# Altium PCB PCB_14layers_1mm73.PcbDoc (part 1 of 4)
Units mm, origin at the board's own origin, x right, y up, seen from the top; angles counter-clockwise.
Board outline 66 x 50 mm, 14 copper layers (Top Layer, Int1 (GND), Int2 (PWR), Int3 (Sign), GND, Int4 (Sign), Int5 (GND), Int6 (PWR), Int7 (Sign), GND2, Int8 (Sign), Int9 (PWR), Int10 (GND), Bottom Layer), stack 1.644 mm thick; 436 components, 541 nets, 2990 pads, 78 vias.
Unrouted connection lines stored in the file: 1647.
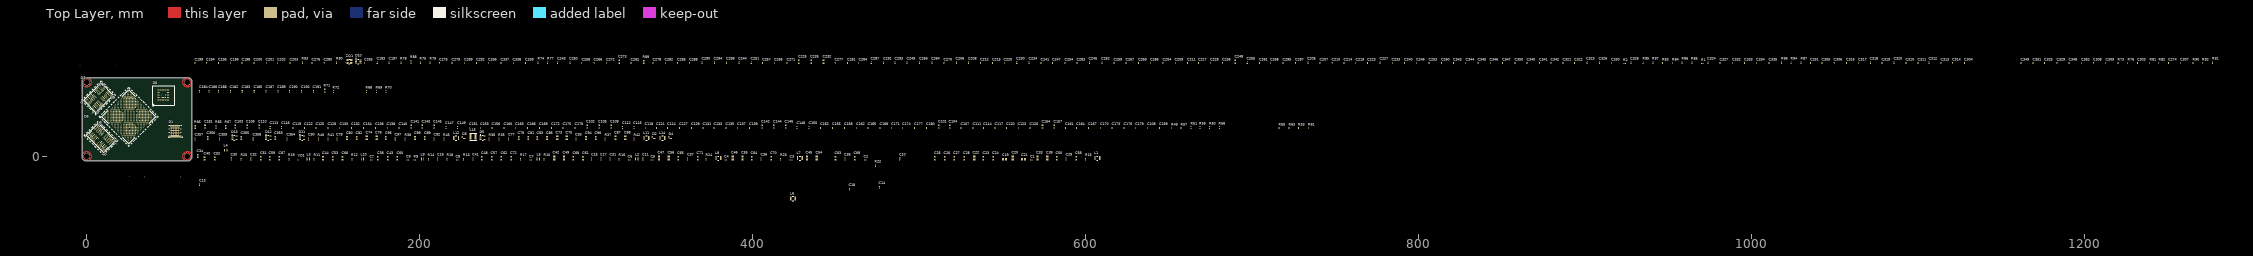
[diagram p0: Top Layer view]
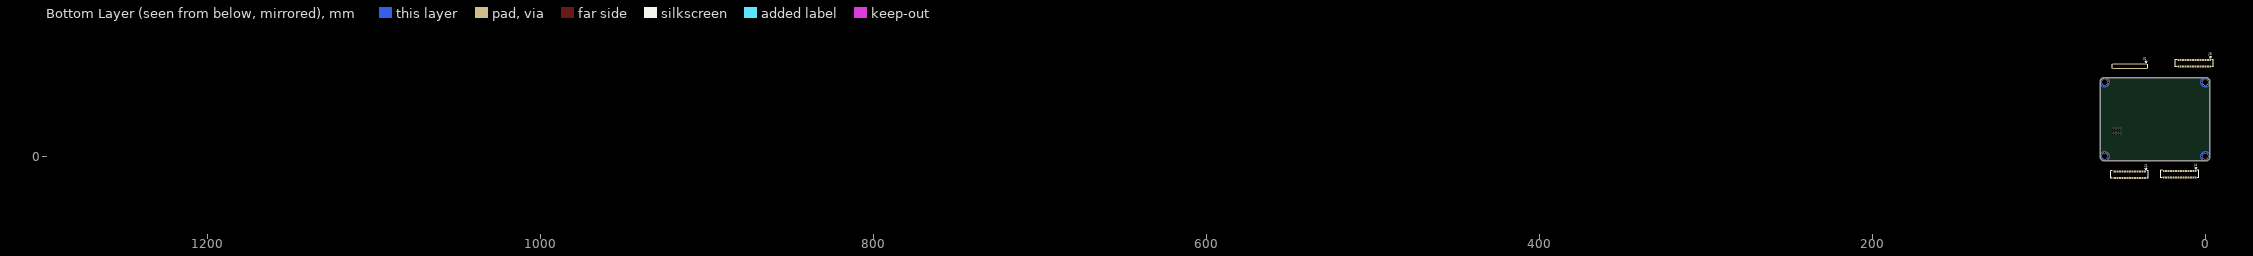
[diagram p1: Bottom Layer view, seen from below]
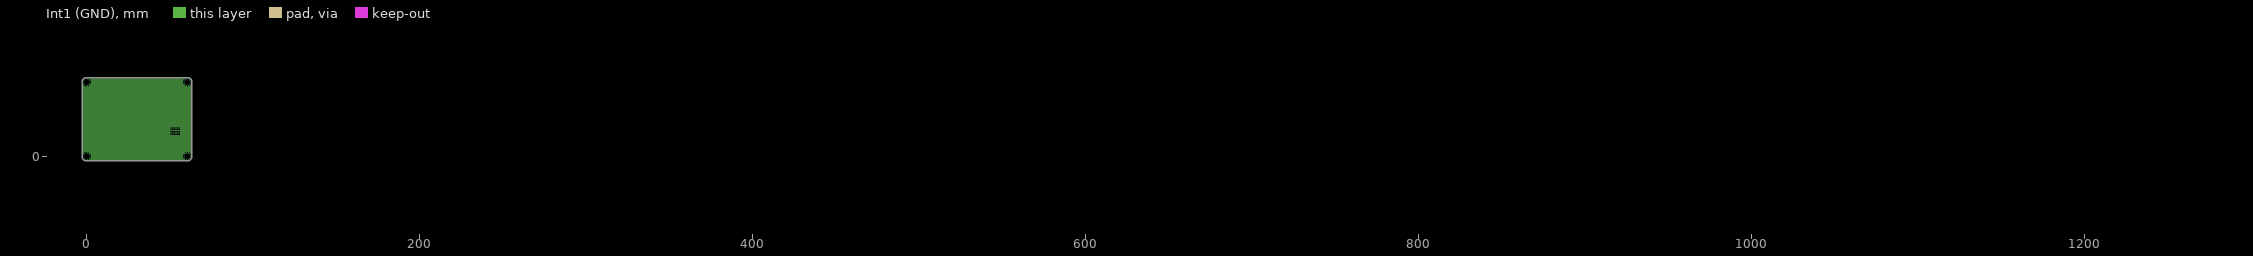
[diagram p2: Int1 (GND), clearances drawn from the general rule]
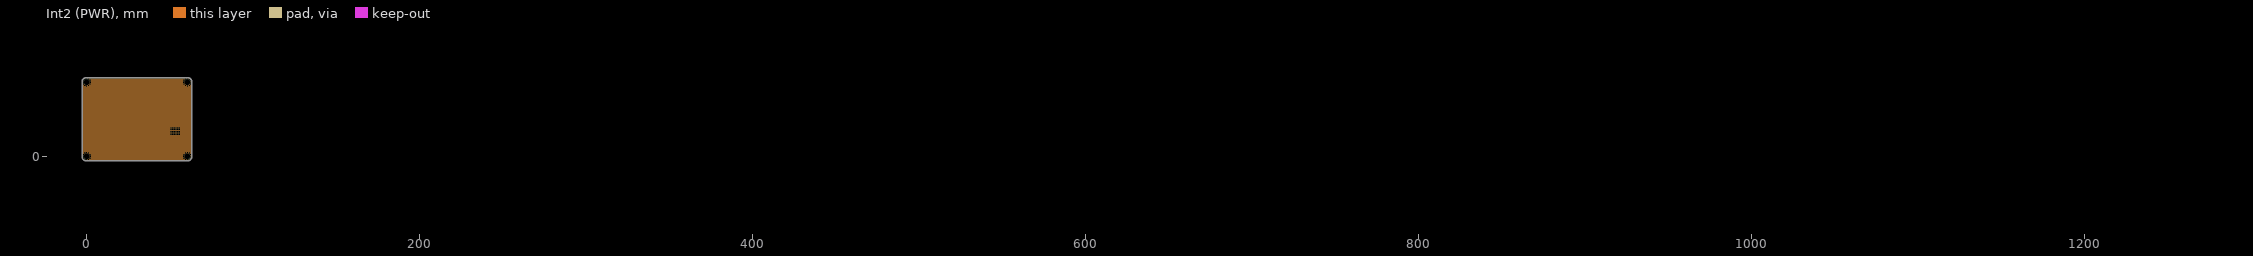
[diagram p3: Int2 (PWR), clearances drawn from the general rule]
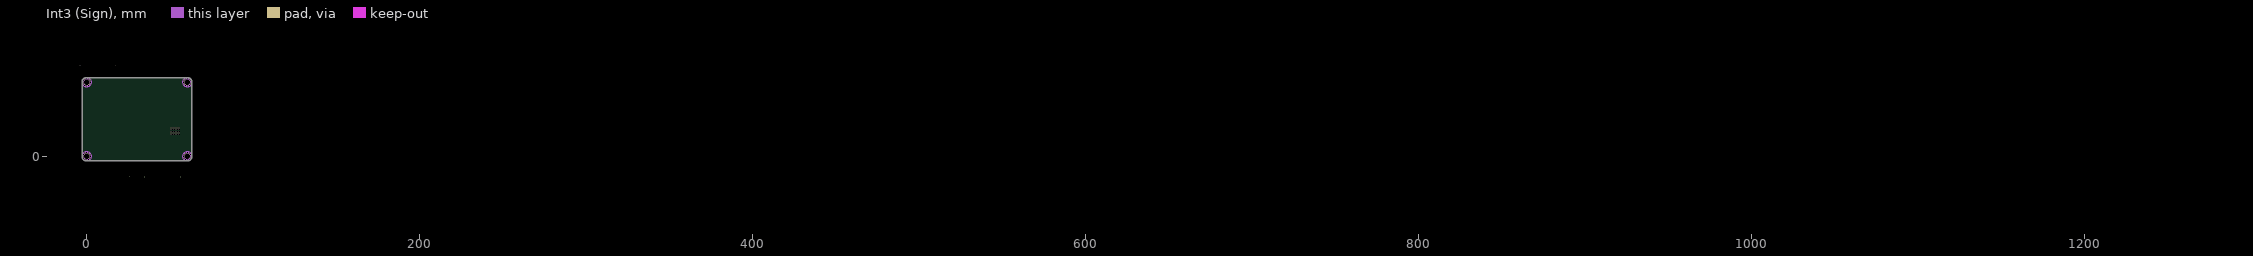
[diagram p4: Int3 (Sign)]
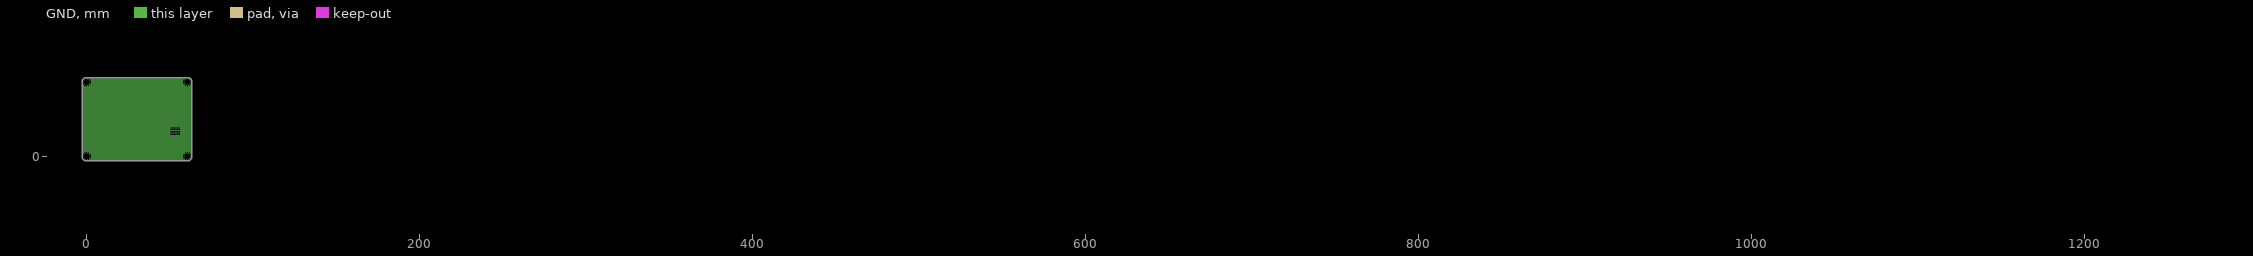
[diagram p5: GND, clearances drawn from the general rule]
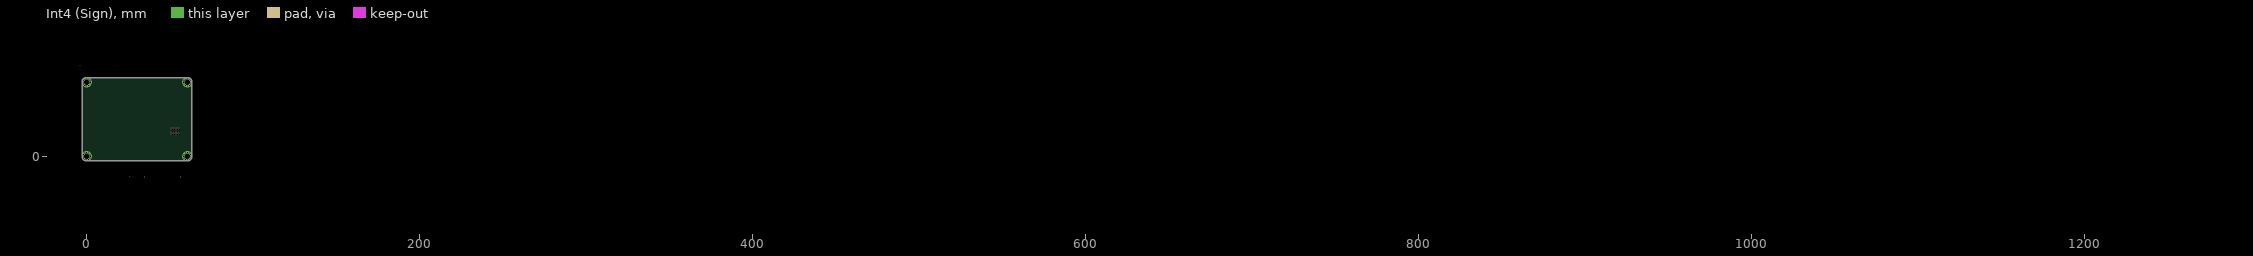
[diagram p6: Int4 (Sign)]
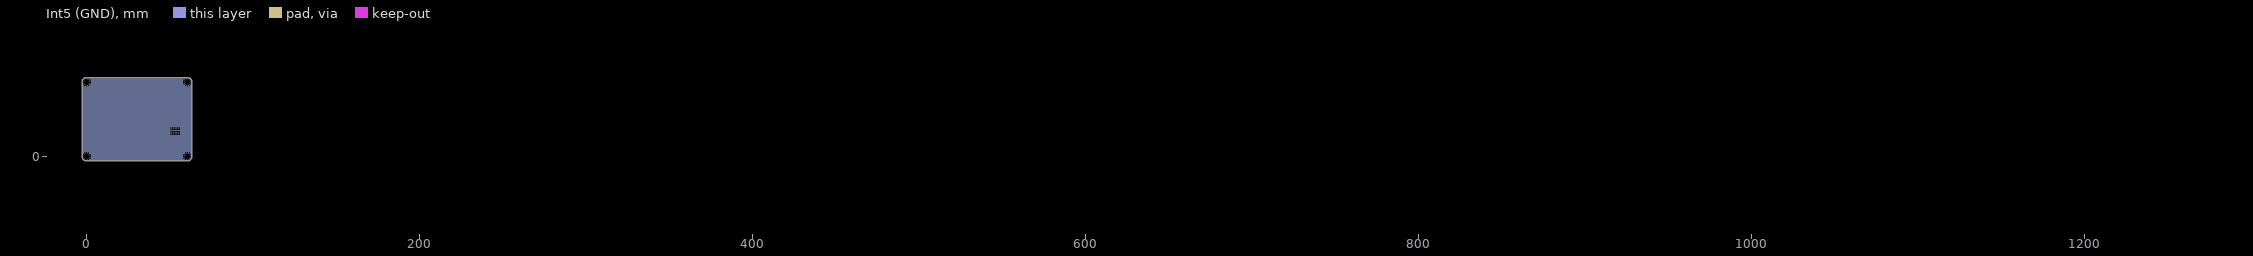
[diagram p7: Int5 (GND), clearances drawn from the general rule]
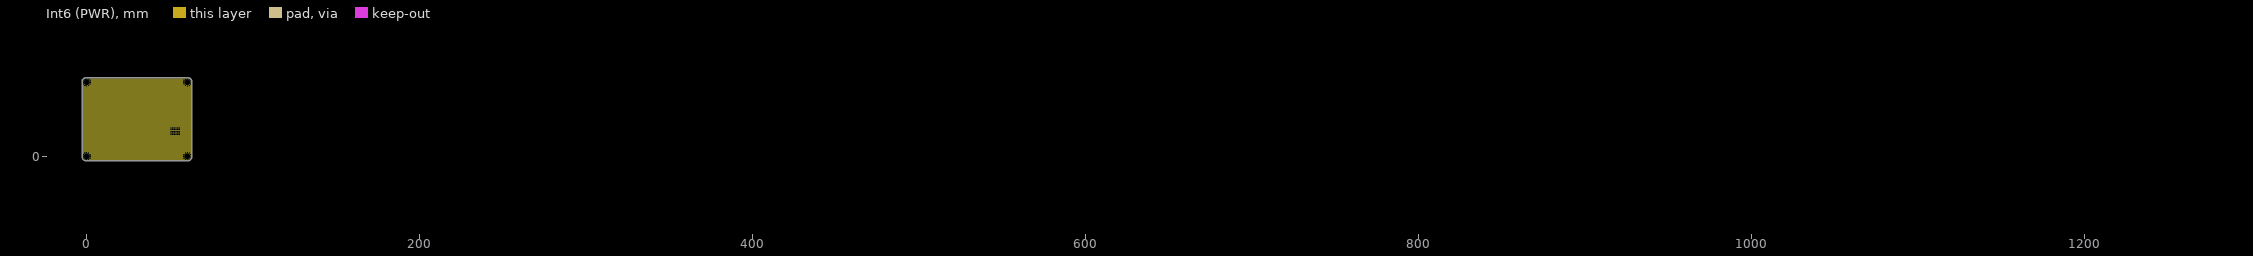
[diagram p8: Int6 (PWR), clearances drawn from the general rule]
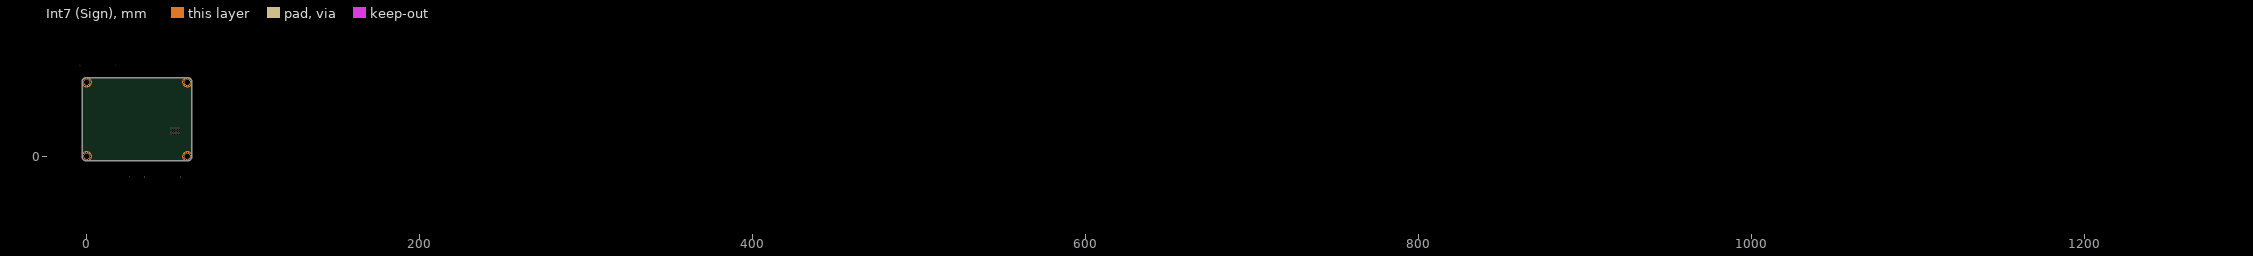
[diagram p9: Int7 (Sign)]
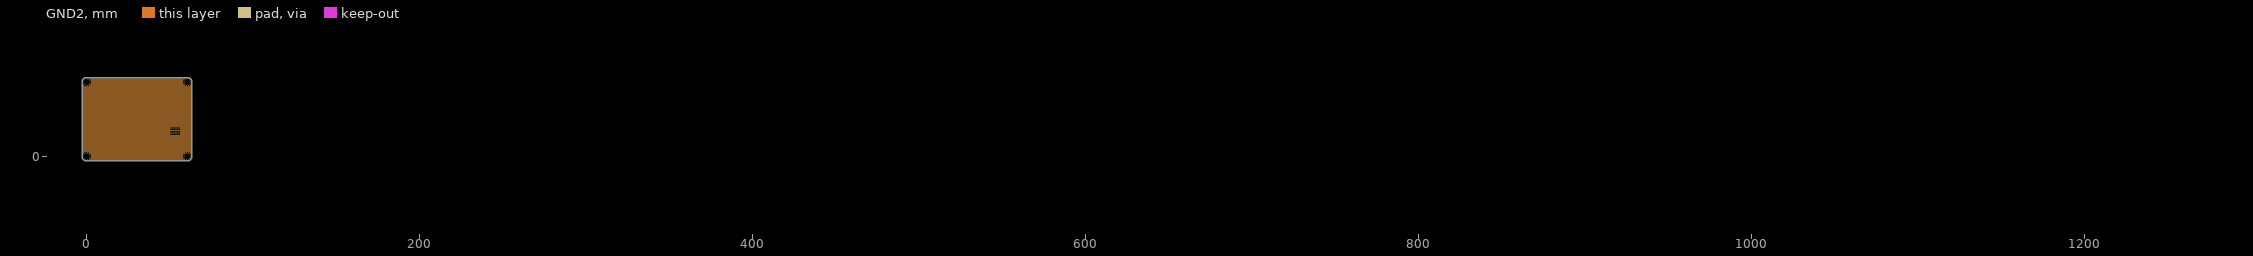
[diagram p10: GND2, clearances drawn from the general rule]
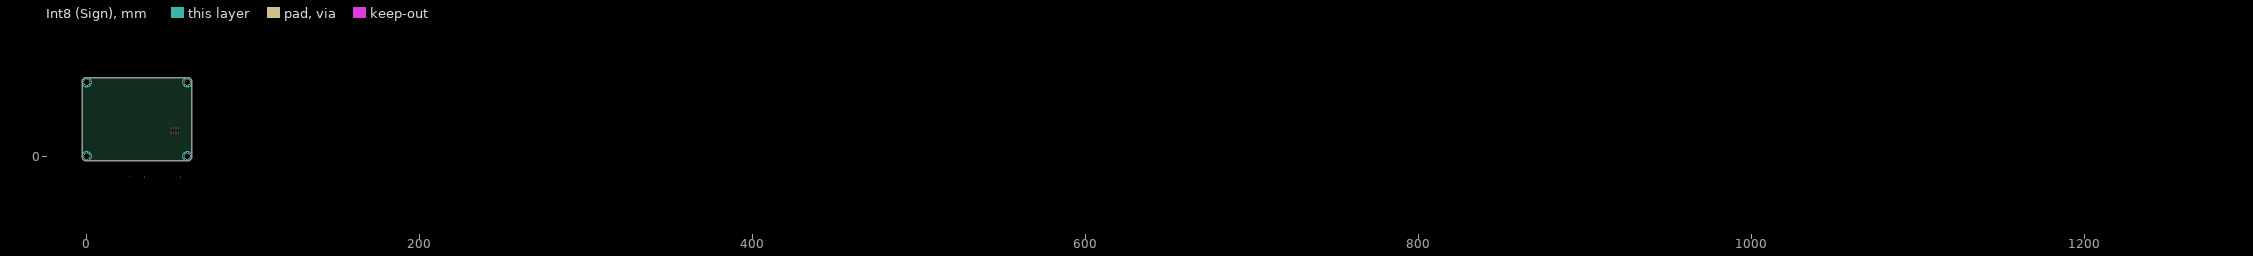
[diagram p11: Int8 (Sign)]
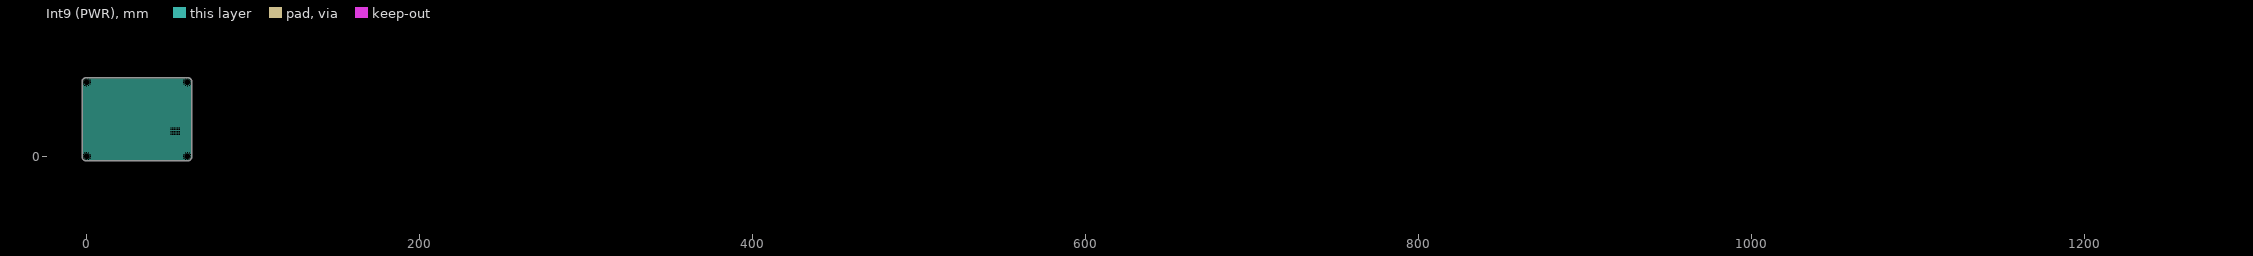
[diagram p12: Int9 (PWR), clearances drawn from the general rule]
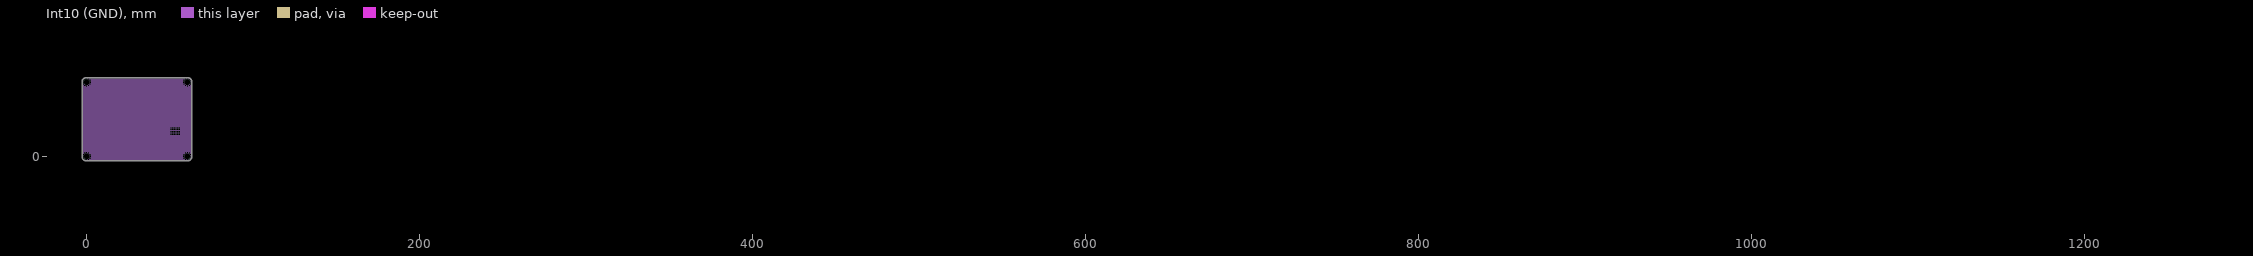
[diagram p13: Int10 (GND), clearances drawn from the general rule]

## Layer stack, top to bottom
Top Solder: solder mask 0.0254, SM-001, Dk 4
Top Layer: signal copper 0.018
Dielectric 1: prepreg 0.076, FR4, Dk 3.6
Int1 (GND): plane copper 0.018
Dielectric 2: core 0.1, FR4, Dk 3.7
Int2 (PWR): plane copper 0.018
Dielectric 3: prepreg 0.076, FR4, Dk 3.6
Int3 (Sign): signal copper 0.018
Dielectric 12: prepreg 0.0711, PP-006, Dk 4.1
Dielectric 18: prepreg 0.0711, PP-006, Dk 4.1
GND: plane copper 0.018
Dielectric 4: core 0.1, FR4, Dk 3.7
Int4 (Sign): signal copper 0.018
Dielectric 14: prepreg 0.076, FR4, Dk 3.6
Dielectric 5: prepreg 0.076, FR4, Dk 3.6
Int5 (GND): plane copper 0.018
Dielectric 6: core 0.1, FR4, Dk 3.7
Int6 (PWR): plane copper 0.018
Dielectric 7: prepreg 0.076, FR4, Dk 3.6
Dielectric 15: prepreg 0.076, FR4, Dk 3.6
Int7 (Sign): signal copper 0.018
Dielectric 8: core 0.1, FR4, Dk 3.7
GND2: plane copper 0.018
Dielectric 19: prepreg 0.0711, PP-006, Dk 4.1
Dielectric 13: prepreg 0.0711, PP-006, Dk 4.1
Int8 (Sign): signal copper 0.018
Dielectric 9: prepreg 0.076, FR4, Dk 3.6
Int9 (PWR): plane copper 0.018
Dielectric 10: core 0.1, FR4, Dk 3.7
Int10 (GND): plane copper 0.018
Dielectric 11: prepreg 0.076, FR4, Dk 3.6
Bottom Layer: signal copper 0.018
Bottom Solder: solder mask 0.0254, SM-001, Dk 4

## Board outline
-2.806,0.021 -2.806,44.521 cw(c-0.181,44.646) -0.306,47.271 60.694,47.271 cw(c60.569,44.646) 63.194,44.521 63.194,0.021 cw(c60.569,-0.104) 60.694,-2.729 -0.306,-2.729 cw(c-0.181,-0.104)

## Design rules (kind name [scope] priority, off if disabled: settings)
AcuteAngle [All] p1: minimum=3.50000000000000E+0001 checktracksonly=FALSE
BoardOutlineClearance "BoardOutlineClearance 1" [All] p1: gap=0.25 ignorepadtopadclearanceinfootprint=FALSE except(0: Arc-SplitContinuation Track-SplitContinuation SMDPad-SplitContinuation THPad-SplitContinuation Via-SplitContinuation Fill-SplitContinuation Poly-SplitContinuation Region-SplitContinuation Text-SplitContinuation) // Milling
BoardOutlineClearance "BoardOutlineClearance 2" [All] p2: gap=0.4 ignorepadtopadclearanceinfootprint=FALSE except(0: Arc-SplitContinuation Track-SplitContinuation SMDPad-SplitContinuation THPad-SplitContinuation Via-SplitContinuation Fill-SplitContinuation Poly-SplitContinuation Region-SplitContinuation Text-SplitContinuation) // V-Cut
Clearance "Clearance 3 Oz" [All] p1 off: gap=0.35 ignorepadtopadclearanceinfootprint=FALSE except(0.25: Arc-Hole Track-Hole SMDPad-Hole THPad-Hole Via-Hole Fill-Hole Poly-Hole Region-Hole Text-Hole)
Clearance "Clearance 2 Oz" [All] p2 off: gap=0.3 ignorepadtopadclearanceinfootprint=FALSE except(0.25: Arc-Hole Track-Hole SMDPad-Hole THPad-Hole Via-Hole Fill-Hole Poly-Hole Region-Hole Text-Hole)
Clearance "Clearance-1 1 Oz" [All] p3 off: gap=0.2 ignorepadtopadclearanceinfootprint=FALSE except(0.25: Arc-Hole Track-Hole SMDPad-Hole THPad-Hole Via-Hole Fill-Hole Poly-Hole Region-Hole Text-Hole) // Standart
Clearance "Clearance-2 1 Oz" [All] p4 off: gap=0.15 ignorepadtopadclearanceinfootprint=FALSE except(0.2: Arc-Fill Arc-Poly Track-Fill Track-Poly SMDPad-Fill SMDPad-Poly THPad-Fill THPad-Poly Via-Fill Via-Poly Fill-Fill Fill-Poly Poly-Poly; 0.25: Arc-Hole Track-Hole SMDPad-Hole THPad-Hole Via-Hole Fill-Hole Poly-Hole Region-Hole Text-Hole) // Advance
Clearance "Clearance-1 1/2 Oz" [All] p5 off: gap=0.125 ignorepadtopadclearanceinfootprint=FALSE except(0.2: Arc-Fill Arc-Poly Track-Fill Track-Poly SMDPad-SMDPad SMDPad-Fill SMDPad-Poly THPad-Fill THPad-Poly Via-Fill Via-Poly Fill-Fill Fill-Poly Poly-Poly Poly-Region Poly-Text; 0.25: Arc-Hole Track-Hole SMDPad-Hole THPad-Hole Via-Hole Fill-Hole Poly-Hole Region-Hole Text-Hole) // Standart
Clearance "Clearance-2 1/2 Oz" [All] p6: gap=0.1 ignorepadtopadclearanceinfootprint=FALSE except(0.15: Arc-Fill Arc-Poly Track-Fill Track-Poly SMDPad-SMDPad SMDPad-Fill SMDPad-Poly THPad-Fill THPad-Poly Via-Fill Via-Poly Fill-Fill Fill-Poly Poly-Poly Poly-Region Poly-Text; 0.25: Arc-Hole Track-Hole SMDPad-Hole THPad-Hole Via-Hole Fill-Hole Poly-Hole Region-Hole Text-Hole) // Advance
DiffPairsRouting "DiffPairsRouting 1 Oz" [All] p1 off: maxlimit=0.254 minlimit=0.2 mostfreqgap=0.254 toplayer_minwidth=0.2 toplayer_maxwidth=0.381 toplayer_prefwidth=0.381 midlayer1_minwidth=0.2 midlayer1_maxwidth=0.381 midlayer1_prefwidth=0.381 midlayer2_minwidth=0.2 midlayer2_maxwidth=0.381 midlayer2_prefwidth=0.381 midlayer3_minwidth=0.2 midlayer3_maxwidth=0.381 midlayer3_prefwidth=0.381 midlayer6_minwidth=0.2 midlayer6_maxwidth=0.381 midlayer6_prefwidth=0.381 bottomlayer_minwidth=0.2 bottomlayer_maxwidth=0.381 bottomlayer_prefwidth=0.381 maxuncoupledlength=12.7
DiffPairsRouting "DiffPairsRouting 1/2 Oz" [All] p2: maxlimit=0.1 minlimit=0.1 mostfreqgap=0.1 toplayer_minwidth=0.125 toplayer_maxwidth=0.125 toplayer_prefwidth=0.125 midlayer1_minwidth=0.1 midlayer1_maxwidth=0.1 midlayer1_prefwidth=0.1 midlayer2_minwidth=0.125 midlayer2_maxwidth=0.125 midlayer2_prefwidth=0.125 midlayer3_minwidth=0.125 midlayer3_maxwidth=0.125 midlayer3_prefwidth=0.125 midlayer6_minwidth=0.1 midlayer6_maxwidth=0.1 midlayer6_prefwidth=0.1 bottomlayer_minwidth=0.125 bottomlayer_maxwidth=0.125 bottomlayer_prefwidth=0.125 impedanceprofiledriven=TRUE impedanceprofileid={C794EA95-4498-4699-8E01-F32A1638D739} impedanceprofilevalue=82.000000 maxuncoupledlength=12.7
HoleSize "Minimum HoleSize" [IsPad] p1: absolutevalues=TRUE maxlimit=5.9 minlimit=0.6 maxpercent=80.000 minpercent=20.000
HoleSize "Minimum HoleSize VIA 1" [IsVia] p2: absolutevalues=TRUE maxlimit=5.9 minlimit=0.3 maxpercent=80.000 minpercent=20.000 // Standart
HoleSize "Minimum HoleSize VIA 2" [IsVia] p3: absolutevalues=TRUE maxlimit=5.9 minlimit=0.2 maxpercent=80.000 minpercent=20.000 // Advance
HoleToHoleClearance Hole2HoleClearance [All] p1: gap=0.25 allowstackedmicrovias=FALSE
MinimumAnnularRing "Minimum AR VIA Standart" [IsVia] p1: minimumring=0.15
MinimumAnnularRing "Minimum AR PAD Standart" [IsPAD] p2: minimumring=0.2
MinimumAnnularRing "Minimum AR VIA Advance" [IsVia] p3: minimumring=0.1
MinimumAnnularRing "Minimum AR PAD Advance" [IsPAD] p4: minimumring=0.15
MinimumSolderMaskSliver "SolderMask Bridge Standart" [All] p1: minsoldermaskwidth=0.15 // All Masks
MinimumSolderMaskSliver "SolderMask Bridge Advance" [All] p2: minsoldermaskwidth=0.1 // Mask LDI
PlaneClearance "PlaneClearance 3 Oz" [All] p1: clearance=0.35
PlaneClearance "PlaneClearance 2 Oz" [All] p2: clearance=0.3
PlaneClearance "PlaneClearance 1 Oz" [All] p3: clearance=0.2
PlaneClearance "PlaneClearance-1 1/2 Oz" [All] p4: clearance=0.2 // Standart
PlaneClearance "PlaneClearance-2 1/2 Oz" [All] p5: clearance=0.15 // Advance
PlaneConnect "TermalConnect 3 Oz" [All] p1: planeconnectstyle=Relief reliefexpansion=0.2 reliefentries=4 reliefconductorwidth=0.35 reliefairgap=0.35 // Standart
PlaneConnect "TermalConnect 2 Oz" [All] p2: planeconnectstyle=Relief reliefexpansion=0.2 reliefentries=4 reliefconductorwidth=0.3 reliefairgap=0.3 // Standart
PlaneConnect "TermalConnect-1 1 Oz" [All] p3: planeconnectstyle=Relief reliefexpansion=0.2 reliefentries=4 reliefconductorwidth=0.2 reliefairgap=0.2 // Standart
PlaneConnect "TermalConnect-2 1 Oz" [All] p4: pad.planeconnectstyle=Relief pad.reliefexpansion=0.15 pad.reliefentries=4 pad.reliefconductorwidth=0.2 pad.reliefairgap=0.2 via.planeconnectstyle=Direct via.reliefexpansion=0.15 via.reliefentries=4 via.reliefconductorwidth=0.15 via.reliefairgap=0.15 // Advance
PlaneConnect "TermalConnect-1 1/2 Oz" [All] p5: planeconnectstyle=Relief reliefexpansion=0.2 reliefentries=4 reliefconductorwidth=0.2 reliefairgap=0.2 // Standart
PlaneConnect "TermalConnect-2 1/2 Oz" [All] p6: pad.planeconnectstyle=Relief pad.reliefexpansion=0.15 pad.reliefentries=4 pad.reliefconductorwidth=0.15 pad.reliefairgap=0.15 via.planeconnectstyle=Direct via.reliefexpansion=0.15 via.reliefentries=4 via.reliefconductorwidth=0.15 via.reliefairgap=0.15 // Advance
PolygonConnect "PolygonConnect 3 Oz" [All] p1: thpad.connectstyle=Relief thpad.reliefconductorwidth=0.35 thpad.reliefentries=4 thpad.polygonreliefangle="90 Angle" thpad.airgapwidth=0.35 smdpad.connectstyle=Relief smdpad.reliefconductorwidth=0.35 smdpad.reliefentries=4 smdpad.polygonreliefangle="90 Angle" smdpad.airgapwidth=0.35 via.connectstyle=Direct via.reliefconductorwidth=0.254 via.reliefentries=4 via.polygonreliefangle="90 Angle" via.airgapwidth=0.254
PolygonConnect "PolygonConnect 2 Oz" [All] p2: thpad.connectstyle=Relief thpad.reliefconductorwidth=0.3 thpad.reliefentries=4 thpad.polygonreliefangle="90 Angle" thpad.airgapwidth=0.3 smdpad.connectstyle=Relief smdpad.reliefconductorwidth=0.3 smdpad.reliefentries=4 smdpad.polygonreliefangle="90 Angle" smdpad.airgapwidth=0.3 via.connectstyle=Direct via.reliefconductorwidth=0.254 via.reliefentries=4 via.polygonreliefangle="90 Angle" via.airgapwidth=0.254
PolygonConnect "PolygonConnect-1 1 Oz" [All] p3: thpad.connectstyle=Relief thpad.reliefconductorwidth=0.2 thpad.reliefentries=4 thpad.polygonreliefangle="90 Angle" thpad.airgapwidth=0.2 smdpad.connectstyle=Relief smdpad.reliefconductorwidth=0.2 smdpad.reliefentries=4 smdpad.polygonreliefangle="90 Angle" smdpad.airgapwidth=0.2 via.connectstyle=Direct via.reliefconductorwidth=0.254 via.reliefentries=4 via.polygonreliefangle="90 Angle" via.airgapwidth=0.254 // Standart
PolygonConnect "PolygonConnect-2 1 Oz" [All] p4: thpad.connectstyle=Relief thpad.reliefconductorwidth=0.15 thpad.reliefentries=4 thpad.polygonreliefangle="90 Angle" thpad.airgapwidth=0.15 smdpad.connectstyle=Relief smdpad.reliefconductorwidth=0.15 smdpad.reliefentries=4 smdpad.polygonreliefangle="90 Angle" smdpad.airgapwidth=0.15 via.connectstyle=Direct via.reliefconductorwidth=0.254 via.reliefentries=4 via.polygonreliefangle="90 Angle" via.airgapwidth=0.254 // Advance
PolygonConnect "PolygonConnect-1 1/2 Oz" [All] p5: thpad.connectstyle=Relief thpad.reliefconductorwidth=0.15 thpad.reliefentries=4 thpad.polygonreliefangle="90 Angle" thpad.airgapwidth=0.2 smdpad.connectstyle=Relief smdpad.reliefconductorwidth=0.2 smdpad.reliefentries=4 smdpad.polygonreliefangle="90 Angle" smdpad.airgapwidth=0.2 via.connectstyle=Direct via.reliefconductorwidth=0.254 via.reliefentries=4 via.polygonreliefangle="90 Angle" via.airgapwidth=0.254 // Standart
PolygonConnect "PolygonConnect-2 1/2 Oz" [All] p6: thpad.connectstyle=Relief thpad.reliefconductorwidth=0.125 thpad.reliefentries=4 thpad.polygonreliefangle="90 Angle" thpad.airgapwidth=0.15 smdpad.connectstyle=Relief smdpad.reliefconductorwidth=0.125 smdpad.reliefentries=4 smdpad.polygonreliefangle="90 Angle" smdpad.airgapwidth=0.15 via.connectstyle=Direct via.reliefconductorwidth=0.254 via.reliefentries=4 via.polygonreliefangle="90 Angle" via.airgapwidth=0.254 // Advance
RoutingCorners [All] p1 off: cornerstyle=45-Degree minsetback=2.54 maxsetback=2.54
RoutingVias [All] p1: holewidth=0.3 width=0.6 viastyle="Through Hole" minholewidth=0.2 minwidth=0.4 maxholewidth=5.9 maxwidth=6.4
SilkToSilkClearance Silk2SilkClearance [All] p1 off: silktosilkclearance=0.15
SilkToSolderMaskClearance Silk2SolderMaskClearance [IsPad] p1 off: minsilkscreentomaskgap=0.15 clearancetoexposedcopper=TRUE
SolderMaskExpansion SolderMaskExpansion-1 [All] p1: expansion=0.05 istentingtop=FALSE // Standart
SolderMaskExpansion "SolderMaskExpansion LDI" [All] p2: expansion=0.025 istentingtop=FALSE // Advance
SupplyNets "Schematic Supply Nets_38" [InNet('VDDQ_DRAM')] p1: voltage=0.000
SupplyNets "Schematic Supply Nets_37" [InNet('VDDQ_DDR_CK')] p2: voltage=0.000
SupplyNets "Schematic Supply Nets_36" [InNet('VCCA1V2_IMAGE')] p3: voltage=0.000
SupplyNets "Schematic Supply Nets_35" [InNet('VOUT8_RK806-1')] p4: voltage=0.000
SupplyNets "Schematic Supply Nets_34" [InNet('VCCA_3V3_P')] p5: voltage=0.000
SupplyNets "Schematic Supply Nets_33" [InNet('VDDA0V75_IMAGE_P')] p6: voltage=0.000
SupplyNets "Schematic Supply Nets_32" [InNet('VCC_2V0_NLDO')] p7: voltage=0.000
SupplyNets "Schematic Supply Nets_31" [InNet('VCCA1V8_IMAGE_P')] p8: voltage=0.000
SupplyNets "Schematic Supply Nets_30" [InNet('VCCIO5')] p9: voltage=0.000
SupplyNets "Schematic Supply Nets_29" [InNet('VCC4V0_SYS')] p10: voltage=0.000
SupplyNets "Schematic Supply Nets_28" [InNet('VDD_DDR')] p11: voltage=0.000
SupplyNets "Schematic Supply Nets_27" [InNet('VDD_CPU_BIG1')] p12: voltage=0.000
SupplyNets "Schematic Supply Nets_26" [InNet('VDD_CPU_LIT')] p13: voltage=0.000
SupplyNets "Schematic Supply Nets_25" [InNet('GND')] p14: voltage=0.000
SupplyNets "Schematic Supply Nets_24" [InNet('VDDA_DDR_PLL_P')] p15: voltage=0.000
SupplyNets "Schematic Supply Nets_23" [InNet('VDD1_1V8_DDR')] p16: voltage=0.000
SupplyNets "Schematic Supply Nets_22" [InNet('VDDA_0V75_PMU_P')] p17: voltage=0.000
SupplyNets "Schematic Supply Nets_21" [InNet('VOUT10_RK806-1')] p18: voltage=0.000
SupplyNets "Schematic Supply Nets_20" [InNet('VCCA_1V8_S3')] p19: voltage=0.000
SupplyNets "Schematic Supply Nets_19" [InNet('VCCA_3V3_S0')] p20: voltage=0.000
SupplyNets "Schematic Supply Nets_18" [InNet('VDD2_DRR')] p21: voltage=0.000
SupplyNets "Schematic Supply Nets_17" [InNet('VDD2_DDR_CKE')] p22: voltage=0.000
SupplyNets "Schematic Supply Nets_16" [InNet('VDD_CPU_BIG0')] p23: voltage=0.000
SupplyNets "Schematic Supply Nets_15" [InNet('5V_PMIC_SYS')] p24: voltage=0.000
SupplyNets "Schematic Supply Nets_14" [InNet('VCC_1V1_NLDO')] p25: voltage=0.000
SupplyNets "Schematic Supply Nets_13" [InNet('VCCIO_SD_P')] p26: voltage=0.000
SupplyNets "Schematic Supply Nets_12" [InNet('VDD_GPU')] p27: voltage=0.000
SupplyNets "Schematic Supply Nets_11" [InNet('VOUT6_RK806-1')] p28: voltage=0.000
SupplyNets "Schematic Supply Nets_10" [InNet('VDDQ_DDR')] p29: voltage=0.000
SupplyNets "Schematic Supply Nets_9" [InNet('VCC_3V3_S3')] p30: voltage=0.000
SupplyNets "Schematic Supply Nets_8" [InNet('VDDA_0V75_P')] p31: voltage=0.000
SupplyNets "Schematic Supply Nets_7" [InNet('VCCA_3V3_S3')] p32: voltage=0.000
SupplyNets "Schematic Supply Nets_6" [InNet('VDD_LOGIC')] p33: voltage=0.000
SupplyNets "Schematic Supply Nets_5" [InNet('VCCA_1V8_P')] p34: voltage=0.000
SupplyNets "Schematic Supply Nets_4" [InNet('VOUT7_RK806-1')] p35: voltage=0.000
SupplyNets "Schematic Supply Nets_3" [InNet('VDDA_0V85_P')] p36: voltage=0.000
SupplyNets "Schematic Supply Nets_2" [InNet('VDD_NPU')] p37: voltage=0.000
SupplyNets "Schematic Supply Nets_1" [InNet('VCC_1V8_S3')] p38: voltage=0.000
SupplyNets "Schematic Supply Nets" [InNet('VDD_VDENC')] p39: voltage=0.000
UnRoutedNet [All] p1: checkbadconnections=TRUE
Width "Width 3 Oz" [All] p1 off: maxlimit=10 minlimit=0.35 preferedwidth=0.4 checkconnectedcopper=TRUE
Width "Width 2 Oz" [All] p2 off: maxlimit=10 minlimit=0.3 preferedwidth=0.35 minimp=50.000000 maximp=50.000000 favimp=50.000000 checkconnectedcopper=TRUE
Width "Width 1 Oz" [All] p3 off: maxlimit=10 minlimit=0.15 preferedwidth=0.2 checkconnectedcopper=TRUE
Width "Width 1/2 Oz" [All] p4: maxlimit=0.15 minlimit=0.1 preferedwidth=0.125 toplayer_minwidth=0.15 toplayer_prefwidth=0.15 midlayer1_maxwidth=0.1 midlayer1_prefwidth=0.1 midlayer2_minwidth=0.125 midlayer2_maxwidth=0.125 midlayer3_minwidth=0.125 midlayer3_maxwidth=0.125 midlayer6_maxwidth=0.1 midlayer6_prefwidth=0.1 bottomlayer_minwidth=0.15 bottomlayer_prefwidth=0.15 impedanceprofiledriven=TRUE impedanceprofileid={9FD3AEFD-EE27-4CCB-BCB7-385980A4058C} impedanceprofilevalue=45.000000 minimp=50.000000 maximp=50.000000 favimp=50.000000 checkconnectedcopper=TRUE
20 further rules are at their usual default settings.

## Classes and differential pairs
differential pair class 82R: DDR_CH0_CLKA DDR_CH0_CLKB DDR_CH0_CLKC DDR_CH0_CLKD DDR_CH0_DQS0A DDR_CH0_DQS0B DDR_CH0_DQS0C DDR_CH0_DQS0D DDR_CH0_DQS1A DDR_CH0_DQS1B DDR_CH0_DQS1C DDR_CH0_DQS1D
net class MIPI_CSI0: J4_pin_10 J4_pin_14 J4_pin_18 J4_pin_22 J4_pin_26 J4_pin_30
net class eMMC: eMMC_CLKOUT eMMC_CMD eMMC_D0 eMMC_D1 eMMC_D2 eMMC_D3 eMMC_D4 eMMC_D5 eMMC_D6 eMMC_D7 eMMC_DATA_STROBE eMMC_RSTn
net class DDR_CH1_LP4/4X_D: DDR_CH1_LP4/4X_CKE0_D DDR_CH1_LP4/4X_CS0_D
net class DDR_CH1_LP4/4X_C: DDR_CH1_LP4/4X_CKE0_C DDR_CH1_LP4/4X_CS0_C
net class DDR_CH0_LP4/4X_B: DDR_CH0_LP4/4X_CKE0_B DDR_CH0_LP4/4X_CS0_B
net class DDR_CH0_LP4: DDR_CH0_LP4/4X_CKE0_A DDR_CH0_LP4/4X_CS0_A
net class DDR_CH0_DM1_D: DDR_CH0_DM1_D DDR_CH0_DQ8_D DDR_CH0_DQ9_D DDR_CH0_DQ10_D DDR_CH0_DQ11_D DDR_CH0_DQ12_D DDR_CH0_DQ13_D DDR_CH0_DQ14_D DDR_CH0_DQ15_D
net class DDR_CH0_DM1_C: DDR_CH0_DM1_C DDR_CH0_DQ8_C DDR_CH0_DQ9_C DDR_CH0_DQ10_C DDR_CH0_DQ11_C DDR_CH0_DQ12_C DDR_CH0_DQ13_C DDR_CH0_DQ14_C DDR_CH0_DQ15_C
net class DDR_CH0_DM1_B: DDR_CH0_DM1_B DDR_CH0_DQ8_B DDR_CH0_DQ9_B DDR_CH0_DQ10_B DDR_CH0_DQ11_B DDR_CH0_DQ12_B DDR_CH0_DQ13_B DDR_CH0_DQ14_B DDR_CH0_DQ15_B
net class DDR_CH0_DM1_A: DDR_CH0_DM1_A DDR_CH0_DQ8_A DDR_CH0_DQ9_A DDR_CH0_DQ10_A DDR_CH0_DQ11_A DDR_CH0_DQ12_A DDR_CH0_DQ13_A DDR_CH0_DQ14_A DDR_CH0_DQ15_A
net class DDR_CH0_DM0_D: DDR_CH0_DM0_D DDR_CH0_DQ0_D DDR_CH0_DQ1_D DDR_CH0_DQ2_D DDR_CH0_DQ3_D DDR_CH0_DQ4_D DDR_CH0_DQ5_D DDR_CH0_DQ6_D DDR_CH0_DQ7_D
net class DDR_CH0_DM0_C: DDR_CH0_DM0_C DDR_CH0_DQ0_C DDR_CH0_DQ1_C DDR_CH0_DQ2_C DDR_CH0_DQ3_C DDR_CH0_DQ4_C DDR_CH0_DQ5_C DDR_CH0_DQ6_C DDR_CH0_DQ7_C
net class DDR_CH0_DM0_B: DDR_CH0_DM0_B DDR_CH0_DQ0_B DDR_CH0_DQ1_B DDR_CH0_DQ2_B DDR_CH0_DQ3_B DDR_CH0_DQ4_B DDR_CH0_DQ5_B DDR_CH0_DQ6_B DDR_CH0_DQ7_B
net class DDR_CH0_DM0_A: DDR_CH0_DM0_A DDR_CH0_DQ0_A DDR_CH0_DQ1_A DDR_CH0_DQ2_A DDR_CH0_DQ3_A DDR_CH0_DQ4_A DDR_CH0_DQ5_A DDR_CH0_DQ6_A DDR_CH0_DQ7_A
net class DDR_CH0_CLKA: DDR_CH0_A0_A DDR_CH0_A1_A DDR_CH0_A2_A DDR_CH0_A3_A DDR_CH0_A4_A DDR_CH0_A5_A
net class DDR_CH0_A_D: DDR_CH0_A0_D DDR_CH0_A1_D DDR_CH0_A2_D DDR_CH0_A3_D DDR_CH0_A4_D DDR_CH0_A5_D
net class DDR_CH0_A_C: CDR_CH0_A4_C DDR_CH0_A0_C DDR_CH0_A1_C DDR_CH0_A2_C DDR_CH0_A3_C DDR_CH0_A5_C
net class DDR_CH0_A_B: DDR_CH0_A0_B DDR_CH0_A1_B DDR_CH0_A2_B DDR_CH0_A3_B DDR_CH0_A4_B DDR_CH0_A5_B
net class 82R: DDR_CH0_CLKB_N DDR_CH0_CLKD_N DDR_CH0_DQS0A_N DDR_CH0_DQS0B_N DDR_CH0_DQS0C_N DDR_CH0_DQS0D_N DDR_CH0_DQS1A_N DDR_CH0_DQS1B_N DDR_CH0_DQS1C_N DDR_CH0_DQS1D_N
component class 10_J4_CONN: J4
component class 09_J3_CONN: J3
component class 08_J2_CONN: J2
component class 07_J1_CONN: J1
component class 06_RK3588MQ: C193 C194 C195 C196 C197 C198 C199 C200 C201 C202 C203 C204 C205 C206 C207 C208 C209 C210 C211 C212 C214 C215 C217 C219 C220 C223 C225 C227 C228 C230 C232 C233 C234 C235 C236 C240 C241 C243 C244 C245 C246 C247 C248 C249 C250 C251 C252 C253 C254 C255 C256 C257 C258 C259 C260 C261 C262 C263 C264 C265 C266 C267 C268 C269 C270 C271 C272 C273 C274 C275 C276 C277 C278 C279 C280 C281 C282 C283 C284 C285 C286 C287 C288 C289 C290 C291 C292 C293 C294 C295 C296 C297 C303 C304 C305 C306 C307 C308 C309 C310 C311 C312 C313 C314 C316 C317 C318 C319 C320 C321 C322 C323 C324 C325 C326 C327 C328 C329 C330 C331 C332 C333 C334 C335 C336 C337 C338 C339 C340 C341 C342 C343 C344 C345 C346 C347 C348 C349 C350 C351 C352 D9 D10 R1 R2 R73 R74 R75 R76 R77 R78 R79 R80 R81 R82 R83 R84 R85 R86 R87 R88 R89 R90 R91 R92 R93 R94 R95 R96 R97 ZQ1
component class 05_eMMC: C182 C183 C184 C185 C186 C187 C188 C189 C190 C191 C192 D8 R68 R69 R70 R71 R72
component class 04_DRAM-LPDDR4X_200P_1X32bit: C101 C102 C103 C104 C105 C106 C107 C108 C109 C110 C111 C112 C113 C114 C115 C116 C117 C118 C119 C120 C121 C122 C123 C124 C125 C126 C127 C128 C129 C130 C131 C132 C133 C134 C135 C136 C137 C138 C139 C140 C141 C142 C143 C144 C145 C146 C147 C148 C149 C150 C151 C152 C153 C154 C155 C156 C157 C158 C159 C160 C161 C162 C163 C164 C165 C166 C167 C168 C169 C170 C171 C172 C173 C174 C175 C176 C177 C178 C179 C180 C181 D6 D7 R49 R50 R51 R53 R55 R57 R58 R59 R61 R63 R65 R66 R67
component class 03_PWR_PMIC_RK860-2_RK860-3: C73 C74 C75 C76 C77 C78 C79 C80 C81 C82 C83 C85 C87 C88 C89 C90 C92 C93 C94 C95 C96 C97 C99 C353 C354 C355 C356 C357 C358 C359 D2 D3 D4 D5 D11 D12 D13 L11 L12 L14 L15 R35 R36 R37 R38 R41 R42 R45 R46
component class 02_PWR_PMIC_RK806-1: C1 C2 C3 C4 C5 C6 C7 C8 C9 C10 C11 C13 C14 C15 C16 C17 C18 C19 C20 C21 C22 C23 C24 C25 C26 C27 C28 C29 C30 C31 C32 C33 C34 C35 C36 C37 C38 C39 C40 C41 C42 C43 C44 C45 C46 C47 C48 C49 C50 C51 C52 C53 C54 C55 C56 C57 C58 C59 C60 C61 C62 C63 C64 C65 C66 C67 C68 C69 C70 C71 C72 C? D1 L1 L2 L3 L4 L5 L6 L7 L8 L9 L10 R9 R10 R11 R12 R13 R14 R15 R16 R17 R18 R19 R20 R22 R23 R24 VD1
differential pair DDR_CH0_DQS1D: +DDR_CH0_DQS1D_P -DDR_CH0_DQS1D_N
differential pair DDR_CH0_DQS1C: +DDR_CH0_DQS1C_P -DDR_CH0_DQS1C_N
differential pair DDR_CH0_DQS1B: +DDR_CH0_DQS1B_P -DDR_CH0_DQS1B_N
differential pair DDR_CH0_DQS1A: +DDR_CH0_DQS1A_P -DDR_CH0_DQS1A_N
differential pair DDR_CH0_DQS0D: +DDR_CH0_DQS0D_P -DDR_CH0_DQS0D_N
differential pair DDR_CH0_DQS0C: +DDR_CH0_DQS0C_P -DDR_CH0_DQS0C_N
differential pair DDR_CH0_DQS0B: +DDR_CH0_DQS0B_P -DDR_CH0_DQS0B_N
differential pair DDR_CH0_DQS0A: +DDR_CH0_DQS0A_P -DDR_CH0_DQS0A_N
differential pair DDR_CH0_CLKD: +DDR_CH0_CLKD_P -DDR_CH0_CLKD_N
differential pair DDR_CH0_CLKC: +DDR_CH0_CLKC_P -DDR_CH0_CLKC_N
differential pair DDR_CH0_CLKB: +DDR_CH0_CLKB_P -DDR_CH0_CLKB_N
differential pair DDR_CH0_CLKA: +DDR_CH0_CLKA_P -DDR_CH0_CLKA_N

## Components (designator, comment, footprint, x,y, rotation, side; value= is the part's Value field where it differs from the comment)
C1 "C1005X5R0J225K050BC" CAPC1005X06N 567.573,-2.1 r0 top value=2.2u
C2 "C1005X5R0J225K050BC" CAPC1005X06N 467.673,-2.1 r0 top value=2.2u
C3 "C1005X5R0J225K050BC" CAPC1005X06N 423.173,-2.1 r0 top value=2.2u
C4 "C1005X5R0J225K050BC" CAPC1005X06N 383.873,-2.1 r0 top value=2.2u
C5 "C1005X5R0J225K050BC" CAPC1005X06N 339.674,-2.1 r0 top value=2.2u
C6 "C1005X5R0J105K050BB" CAPC1005X06N 325.974,-2.1 r0 top value=1u
C7 "C1005X5R0J105K050BB" CAPC1005X06N 266.774,-2.1 r0 top value=1u
C8 "C1005X5R0J105K050BB" CAPC1005X06N 222.574,-2.1 r0 top value=1u
C9 "C1005X5R0J105K050BB" CAPC1005X06N 192.874,-2.1 r0 top value=1u
C10 "C1005X5R1A105K050BB" CAPC1005X06N 488.473,-1.6 r90 top value=1u
C11 "C1005X5R0J105K050BB" CAPC1005X06N 334.074,-1.6 r90 top value=1u
C13 "C1005X5R0J105K050BB" CAPC1005X06N 67.8,-17.1 r90 top value=1u
C14 "C1005X5R0J105K050BB" CAPC1005X06N 476.3,-18.5 r90 top value=1u
C15 "C1005X5R1A105K050BB" CAPC1005X06N 303.374,-1.6 r90 top value=1u
C16 "C1005C0G1E102J050BA" CAPC1005X06N 210.874,-1.6 r90 top value=1n
C17 "C1005X5R0J105K050BB" CAPC1005X06N 308.974,-1.6 r90 top value=1u
C18 "C1005X5R0J105K050BB" CAPC1005X06N 458.2,-19.7 r90 top value=1u
C19 "C2012X5R1A226K125AB" CAPC2012X12N 551.473,-1.7 r0 top value=22u
C20 "C2012X5R1A226K125AB" CAPC2012X12N 556.373,-1 r90 top value=22u
C21 "C2012X5R1A226K125AB" CAPC2012X12N 562.873,-1.7 r0 top value=22u
C22 "C2012X5R1A226K125AB" CAPC2012X12N 533.173,-1 r90 top value=22u
C23 "C1608X5R1A106K080AC" CAPC1608X08N 538.773,-1.2 r90 top value=10u
C24 "C1608X5R1A106K080AC" CAPC1608X08N 544.673,-1.2 r90 top value=10u
C25 "C1608X5R1A106K080AC" CAPC1608X08N 509.573,-1.2 r90 top value=10u
C26 "C1608X5R1A106K080AC" CAPC1608X08N 515.473,-1.2 r90 top value=10u
C27 "C1608X5R1A106K080AC" CAPC1608X08N 521.273,-1.2 r90 top value=10u
C28 "C1608X5R1A106K080AC" CAPC1608X08N 527.173,-1.2 r90 top value=10u
C29 "C1005X5R1A105K050BB" CAPC1005X06N 588.373,-1.6 r90 top value=1u
C30 "C1005C0G1H101K050BA" CAPC1005X06N 86.874,-1.6 r90 top value=100p
C31 "C1005X5R1A105K050BB" CAPC1005X06N 314.474,-1.6 r90 top value=1u
C32 "C1005X5R1A105K050BB" CAPC1005X06N 98.574,-1.6 r90 top value=1u
C33 "C2012X5R0J476M125AC" CAPC2012X12N 571.273,-1 r90 top value=47u
C34 "C1608X5R1A106K080AC" CAPC1608X08N 66.7,0.1 r90 top value=10u
C35 "C1005X5R1A105K050BB" CAPC1005X06N 455.473,-1.6 r90 top value=1u
C36 "C1005X5R1A105K050BB" CAPC1005X06N 405.173,-1.6 r90 top value=1u
C37 "C1005X5R1A105K050BB" CAPC1005X06N 360.974,-1.6 r90 top value=1u
C38 "C1608X5R0J226M080AC" CAPC1608X08N 174.974,-1.2 r90 top value=22u
C39 "C2012X5R0J476M125AC" CAPC2012X12N 577.173,-1 r90 top value=47u
C40 "C1608X5R0J226M080AC" CAPC1608X08N 70.8,-1.4 r90 top value=22u
C41 "C1005C0G1H101K050BA" CAPC1005X06N 231.974,-1.6 r90 top value=100p
C42 "C2012X5R0J476M125AC" CAPC2012X12N 280.874,-1 r90 top value=47u
C43 "C1608X5R1A106K080AC" CAPC1608X08N 180.874,-1.2 r90 top value=10u
C44 "C1608X5R1A106K080AC" CAPC1608X08N 141.974,-1.2 r90 top value=10u
C45 "C2012X5R0J476M125AC" CAPC2012X12N 432.773,-1 r90 top value=47u
C46 "C2012X5R0J476M125AC" CAPC2012X12N 388.073,-1 r90 top value=47u
C47 "C2012X5R0J476M125AC" CAPC2012X12N 343.874,-1 r90 top value=47u
C48 "C1608X5R0J106K080AB" CAPC1608X08N 237.474,-1.2 r90 top value=10u
C49 "C2012X5R0J476M125AC" CAPC2012X12N 286.774,-1 r90 top value=47u
C50 "C1608X5R0J226M080AC" CAPC1608X08N 582.773,-1.2 r90 top value=22u
C51 "C1608X5R1A106K080AC" CAPC1608X08N 104.674,-1.2 r90 top value=10u
C52 "C1608X5R1A106K080AC" CAPC1608X08N 76.9,-1.3 r90 top value=10u
C53 "C1608X5R0J226M080AC" CAPC1608X08N 147.874,-1.2 r90 top value=22u
C54 "C2012X5R0J476M125AC" CAPC2012X12N 438.673,-1 r90 top value=47u
C55 "C2012X5R0J476M125AC" CAPC2012X12N 393.973,-1 r90 top value=47u
C56 "C2012X5R0J476M125AC" CAPC2012X12N 349.774,-1 r90 top value=47u
C57 "C1608X5R0J226M080AC" CAPC1608X08N 243.374,-1.2 r90 top value=22u
C58 "C1608X5R0J226M080AC" CAPC1608X08N 594.473,-1.2 r90 top value=22u
C59 "C1608X5R0J226M080AC" CAPC1608X08N 109.974,-1.2 r90 top value=22u
C60 "C1608X5R1A106K080AC" CAPC1608X08N 186.674,-1.2 r90 top value=10u
C61 "C1608X5R0J226M080AC" CAPC1608X08N 298.174,-1.2 r90 top value=22u
C62 "C1608X5R0J226M080AC" CAPC1608X08N 249.174,-1.2 r90 top value=22u
C63 "C1608X5R0J226M080AC" CAPC1608X08N 449.873,-1.2 r90 top value=22u
C64 "C1608X5R0J226M080AC" CAPC1608X08N 399.573,-1.2 r90 top value=22u
C65 "C1608X5R0J226M080AC" CAPC1608X08N 355.374,-1.2 r90 top value=22u
C66 "C1608X5R1A106K080AC" CAPC1608X08N 153.674,-1.2 r90 top value=10u
C67 "C1608X5R0J226M080AC" CAPC1608X08N 115.774,-1.2 r90 top value=22u
C68 "C1608X5R0J226M080AC" CAPC1608X08N 292.374,-1.2 r90 top value=22u
C69 "C1608X5R0J226M080AC" CAPC1608X08N 461.473,-1.2 r90 top value=22u
C70 "C1608X5R0J226M080AC" CAPC1608X08N 411.273,-1.2 r90 top value=22u
C71 "C1608X5R0J226M080AC" CAPC1608X08N 367.074,-1.2 r90 top value=22u
C72 "C1608X5R0J226M080AC" CAPC1608X08N 254.974,-1.2 r90 top value=22u
C73 "C2012X5R1A226K125AB" CAPC2012X12N 282.674,11.1 r90 top value=22u
C74 "C2012X5R1A226K125AB" CAPC2012X12N 168.274,11.1 r90 top value=22u
C75 "C2012X5R1A226K125AB" CAPC2012X12N 288.474,11.1 r90 top value=22u
C76 "C2012X5R1A226K125AB" CAPC2012X12N 174.174,11.1 r90 top value=22u
C77 "C1005X5R1A105K050BB" CAPC1005X06N 253.474,10.4 r90 top value=1u
C78 "C1005X5R1A105K050BB" CAPC1005X06N 150.374,10.4 r90 top value=1u
C79 "C1608X5R0J226M080AC" CAPC1608X08N 259.574,10.9 r90 top value=22u
C80 "C1608X5R0J226M080AC" CAPC1608X08N 156.374,10.9 r90 top value=22u
C81 "C1608X5R0J226M080AC" CAPC1608X08N 265.374,10.9 r90 top value=22u
C82 "C1608X5R0J226M080AC" CAPC1608X08N 162.274,10.9 r90 top value=22u
C83 "C1608X5R0J226M080AC" CAPC1608X08N 270.774,10.9 r90 top value=22u
C85 "C1608X5R0J226M080AC" CAPC1608X08N 276.574,10.9 r90 top value=22u
C87 "C2012X5R1A226K125AB" CAPC2012X12N 317.674,11.1 r90 top value=22u
C88 "C2012X5R1A226K125AB" CAPC2012X12N 323.574,11.1 r90 top value=22u
C89 "C1608X5R1A106K080AC" CAPC1608X08N 203.174,10.9 r90 top value=10u
C90 "C1005X5R1E104K050BC" CAPC1005X06N 133.374,10.4 r90 top value=0.1u
C92 "C1005C0G1H101K050BA" CAPC1005X06N 208.774,10.4 r90 top value=100p
C93 "C1005X5R1A105K050BB" CAPC1005X06N 293.874,10.4 r90 top value=1u
C94 "C1608X5R0J226M080AC" CAPC1608X08N 299.974,10.9 r90 top value=22u
C95 "C1608X5R0J226M080AC" CAPC1608X08N 179.774,10.9 r90 top value=22u
C96 "C1608X5R0J226M080AC" CAPC1608X08N 305.774,10.9 r90 top value=22u
C97 "C1005X5R1A104K050BA" CAPC1005X06N 185.374,10.4 r90 top value=0.1u
C99 "C1608X5R0J106K080AB" CAPC1608X08N 197.274,10.9 r90 top value=10u
C101 "C1608X5R1A106K080AC" CAPC1608X08N 511.973,17.8 r90 top value=10u
C102 "C1608X5R0J226M080AC" CAPC1608X08N 300.774,17.8 r90 top value=22u
C103 "C1608X5R0J226M080AC" CAPC1608X08N 89.374,17.8 r90 top value=22u
C104 "C1608X5R0J106K080AB" CAPC1608X08N 518.573,17.8 r90 top value=10u
C105 "C1608X5R1A106K080AC" CAPC1608X08N 307.874,17.8 r90 top value=10u
C106 "C1608X5R1A106K080AC" CAPC1608X08N 96.474,17.8 r90 top value=10u
C107 "C0603X5R1A104K030BC" CAPC0603X03N 525.373,17 r90 top value=0.1u
C108 "C0603X5R1E102K030BA" CAPC0603X03N 637.473,17 r90 top value=1n
C109 "C1608X5R0J106K080AB" CAPC1608X08N 315.074,17.8 r90 top value=10u
C110 "C1608X5R0J106K080AB" CAPC1608X08N 103.574,17.8 r90 top value=10u
C111 "C0603X5R1A104K030BC" CAPC0603X03N 532.473,17 r90 top value=0.1u
C112 "C1005X5R0J105K050BB" CAPC1005X06N 321.974,17.3 r90 top value=1u
C113 "C1005X5R0J105K050BB" CAPC1005X06N 110.274,17.3 r90 top value=1u
C114 "C0603X5R1A104K030BC" CAPC0603X03N 538.873,17 r90 top value=0.1u
C115 "C1005X5R0J105K050BB" CAPC1005X06N 328.774,17.3 r90 top value=1u
C116 "C1005X5R0J105K050BB" CAPC1005X06N 117.174,17.3 r90 top value=1u
C117 "C0603X5R1A104K030BC" CAPC0603X03N 545.673,17 r90 top value=0.1u
C118 "C0603X5R1A104K030BC" CAPC0603X03N 335.574,17 r90 top value=0.1u
C119 "C0603X5R1A104K030BC" CAPC0603X03N 123.874,17 r90 top value=0.1u
C120 "C0603X5R1A104K030BC" CAPC0603X03N 552.573,17 r90 top value=0.1u
C121 "C0603X5R1A104K030BC" CAPC0603X03N 342.374,17 r90 top value=0.1u
C122 "C0603X5R1A104K030BC" CAPC0603X03N 130.774,17 r90 top value=0.1u
C123 "C0603X5R1A104K030BC" CAPC0603X03N 559.673,17 r90 top value=0.1u
C124 "C0603X5R1A104K030BC" CAPC0603X03N 348.974,17 r90 top value=0.1u
C125 "C0603X5R1A104K030BC" CAPC0603X03N 137.874,17 r90 top value=0.1u
C126 "C0603X5R1A104K030BC" CAPC0603X03N 566.773,17 r90 top value=0.1u
C127 "C0603X5R1A104K030BC" CAPC0603X03N 356.174,17 r90 top value=0.1u
C128 "C0603X5R1A104K030BC" CAPC0603X03N 144.974,17 r90 top value=0.1u
C129 "C0603X5R1A104K030BC" CAPC0603X03N 363.274,17 r90 top value=0.1u
C130 "C0603X5R1A104K030BC" CAPC0603X03N 152.074,17 r90 top value=0.1u
C131 "C0603X5R1A104K030BC" CAPC0603X03N 370.374,17 r90 top value=0.1u
C132 "C0603X5R1A104K030BC" CAPC0603X03N 159.174,17 r90 top value=0.1u
C133 "C0603X5R1A104K030BC" CAPC0603X03N 376.974,17 r90 top value=0.1u
C134 "C0603X5R1A104K030BC" CAPC0603X03N 166.274,17 r90 top value=0.1u
C135 "C0603X5R1A104K030BC" CAPC0603X03N 384.073,17 r90 top value=0.1u
C136 "C0603X5R1A104K030BC" CAPC0603X03N 173.474,17 r90 top value=0.1u
C137 "C0603X5R1A104K030BC" CAPC0603X03N 391.173,17 r90 top value=0.1u
C138 "C0603X5R1A104K030BC" CAPC0603X03N 180.574,17 r90 top value=0.1u
C139 "C0603X5R1A104K030BC" CAPC0603X03N 398.273,17 r90 top value=0.1u
C140 "C0603X5R1A104K030BC" CAPC0603X03N 187.674,17 r90 top value=0.1u
C141 "C1608X5R0J226M080AC" CAPC1608X08N 195.074,17.8 r90 top value=22u
C142 "C1608X5R0J226M080AC" CAPC1608X08N 405.773,17.8 r90 top value=22u
C143 "C1608X5R1A106K080AC" CAPC1608X08N 201.674,17.8 r90 top value=10u
C144 "C1608X5R1A106K080AC" CAPC1608X08N 412.873,17.8 r90 top value=10u
C145 "C1608X5R0J106K080AB" CAPC1608X08N 208.774,17.8 r90 top value=10u
C146 "C1608X5R0J106K080AB" CAPC1608X08N 419.973,17.8 r90 top value=10u
C147 "C1005X5R0J105K050BB" CAPC1005X06N 215.774,17.3 r90 top value=1u
C148 "C1005X5R0J105K050BB" CAPC1005X06N 426.873,17.3 r90 top value=1u
C149 "C1005X5R0J105K050BB" CAPC1005X06N 222.874,17.3 r90 top value=1u
C150 "C1005X5R0J105K050BB" CAPC1005X06N 433.973,17.3 r90 top value=1u
C151 "C0603X5R1A104K030BC" CAPC0603X03N 229.874,17 r90 top value=0.1u
C152 "C0603X5R1A104K030BC" CAPC0603X03N 440.973,17 r90 top value=0.1u
C153 "C0603X5R1A104K030BC" CAPC0603X03N 236.474,17 r90 top value=0.1u
C154 "C1608X5R1A106K080AC" CAPC1608X08N 574.273,17.8 r90 top value=10u
C155 "C0603X5R1A104K030BC" CAPC0603X03N 448.073,17 r90 top value=0.1u
C156 "C0603X5R1A104K030BC" CAPC0603X03N 243.574,17 r90 top value=0.1u
C157 "C1608X5R0J106K080AB" CAPC1608X08N 581.373,17.8 r90 top value=10u
C158 "C0603X5R1A104K030BC" CAPC0603X03N 455.273,17 r90 top value=0.1u
C159 "C0603X5R1E102K030BA" CAPC0603X03N 644.573,17 r90 top value=1n
C160 "C0603X5R1A104K030BC" CAPC0603X03N 250.674,17 r90 top value=0.1u
C161 "C0603X5R1A104K030BC" CAPC0603X03N 588.173,17 r90 top value=0.1u
C162 "C0603X5R1A104K030BC" CAPC0603X03N 462.373,17 r90 top value=0.1u
C163 "C0603X5R1A104K030BC" CAPC0603X03N 257.774,17 r90 top value=0.1u
C164 "C0603X5R1A104K030BC" CAPC0603X03N 594.773,17 r90 top value=0.1u
C165 "C0603X5R1A104K030BC" CAPC0603X03N 469.473,17 r90 top value=0.1u
C166 "C0603X5R1A104K030BC" CAPC0603X03N 264.874,17 r90 top value=0.1u
C167 "C0603X5R1A104K030BC" CAPC0603X03N 601.873,17 r90 top value=0.1u
C168 "C0603X5R1A104K030BC" CAPC0603X03N 476.573,17 r90 top value=0.1u
C169 "C0603X5R1A104K030BC" CAPC0603X03N 271.974,17 r90 top value=0.1u
C170 "C0603X5R1A104K030BC" CAPC0603X03N 608.973,17 r90 top value=0.1u
C171 "C0603X5R1A104K030BC" CAPC0603X03N 483.673,17 r90 top value=0.1u
C172 "C0603X5R1A104K030BC" CAPC0603X03N 279.174,17 r90 top value=0.1u
C173 "C0603X5R1A104K030BC" CAPC0603X03N 616.073,17 r90 top value=0.1u
C174 "C0603X5R1A104K030BC" CAPC0603X03N 490.273,17 r90 top value=0.1u
C175 "C0603X5R1A104K030BC" CAPC0603X03N 286.274,17 r90 top value=0.1u
C176 "C0603X5R1A104K030BC" CAPC0603X03N 623.173,17 r90 top value=0.1u
C177 "C0603X5R1A104K030BC" CAPC0603X03N 497.373,17 r90 top value=0.1u
C178 "C0603X5R1A104K030BC" CAPC0603X03N 293.374,17 r90 top value=0.1u
C179 "C0603X5R1A104K030BC" CAPC0603X03N 630.273,17 r90 top value=0.1u
C180 "C0603X5R1A104K030BC" CAPC0603X03N 504.573,17 r90 top value=0.1u
C181 "C1608X5R1A106K080AC" CAPC1608X08N 71.074,17.8 r90 top value=10u
C182 "C1005X5R1A104K050BA" CAPC1005X06N 86.374,39 r90 top value=0.1u
C183 "C1005X5R1A104K050BA" CAPC1005X06N 93.474,39 r90 top value=0.1u
C184 "C1005X5R1A104K050BA" CAPC1005X06N 67.9,39 r90 top value=0.1u
C185 "C1005X5R1A104K050BA" CAPC1005X06N 100.674,39 r90 top value=0.1u
C186 "C1005X5R1A104K050BA" CAPC1005X06N 73.5,39.1 r90 top value=0.1u
C187 "C1005X5R1A104K050BA" CAPC1005X06N 107.774,39 r90 top value=0.1u
C188 "C1005X5R0J475K050BC" CAPC1005X06N 79.274,39 r90 top value=4.7u
C189 "C1005X5R0J475K050BC" CAPC1005X06N 114.874,39 r90 top value=4.7u
C190 "C1005X5R1A225K050BC" CAPC1005X06N 121.974,39 r90 top value=2.2u
C191 "C1005C0G1H100D050BA" CAPC1005X06N 136.174,39 r90 top value=10p
C192 "C1005X5R1A104K050BA" CAPC1005X06N 129.074,39 r90 top value=0.1u
C193 "C1005C0G1H180J050BA" CAPC1005X06N 174.574,56.299 r90 top value=18p
C194 "C0603X5R0J105M030BC" CAPC0603X03N 72.074,55.999 r90 top value=1u
C195 "C0603X5R1A104K030BC" CAPC0603X03N 79.174,55.999 r90 top value=0.1u
C196 "C0603X5R0J105M030BC" CAPC0603X03N 86.274,55.999 r90 top value=1u
C197 "C1005C0G1H180J050BA" CAPC1005X06N 181.674,56.299 r90 top value=18p
C198 "C0603X5R1A104K030BC" CAPC0603X03N 93.374,55.999 r90 top value=0.1u
C199 "C0603X5R1A104K030BC" CAPC0603X03N 64.974,55.999 r90 top value=0.1u
C200 "C0603X5R0J105M030BC" CAPC0603X03N 100.474,55.999 r90 top value=1u
C201 "C0603X5R1A104K030BC" CAPC0603X03N 107.874,55.999 r90 top value=0.1u
C202 "C0603X5R1A104K030BC" CAPC0603X03N 114.774,55.999 r90 top value=0.1u
C203 "C0603X5R1A104K030BC" CAPC0603X03N 122.174,55.999 r90 top value=0.1u
C204 "C0603X5R0J105M030BC" CAPC0603X03N 646.573,55.999 r90 top value=1u
C205 "CC0402MRX5R4BB106" CAPC1005X06N 733.673,56.299 r90 top value=10u
C206 "CC0402MRX5R4BB106" CAPC1005X06N 522.473,56.299 r90 top value=10u
C207 "C0603X5R0J105M030BC" CAPC0603X03N 740.873,55.999 r90 top value=1u
C208 "C1005X5R0J475K050BC" CAPC1005X06N 529.873,56.299 r90 top value=4.7u
C209 "C0603X5R0J105M030BC" CAPC0603X03N 653.973,55.999 r90 top value=1u
C210 "C0603X5R0J105M030BC" CAPC0603X03N 748.273,55.999 r90 top value=1u
C211 "C0603X5R0J105M030BC" CAPC0603X03N 661.373,55.999 r90 top value=1u
C212 "C0603X5R1A104K030BC" CAPC0603X03N 537.073,55.999 r90 top value=0.1u
C214 "C0603X5R1A104K030BC" CAPC0603X03N 755.373,55.999 r90 top value=0.1u
C215 "C0603X5R0J105M030BC" CAPC0603X03N 544.173,55.999 r90 top value=1u
C217 "C0603X5R0J105M030BC" CAPC0603X03N 667.973,55.999 r90 top value=1u
C219 "C0603X5R1A104K030BC" CAPC0603X03N 762.473,55.999 r90 top value=0.1u
C220 "C0603X5R1A104K030BC" CAPC0603X03N 551.273,55.999 r90 top value=0.1u
C223 "C0603X5R1A104K030BC" CAPC0603X03N 769.573,55.999 r90 top value=0.1u
C225 "C1608X5R0J226M080AC" CAPC1608X08N 427.873,56.799 r90 top value=22u
C227 "CC0402MRX5R4BB106" CAPC1005X06N 777.073,56.299 r90 top value=10u
C228 "C0603X5R0J105M030BC" CAPC0603X03N 675.073,55.999 r90 top value=1u
C230 "CC0402MRX5R4BB106" CAPC1005X06N 558.773,56.299 r90 top value=10u
C232 "C1608X5R0J226M080AC" CAPC1608X08N 442.673,56.799 r90 top value=22u
C233 "C0603X5R0J105M030BC" CAPC0603X03N 784.373,55.999 r90 top value=1u
C234 "C1005X5R0J475K050BC" CAPC1005X06N 566.173,56.299 r90 top value=4.7u
C235 "C1608X5R0J226M080AC" CAPC1608X08N 435.273,56.799 r90 top value=22u
C236 "C0603X5R0J105M030BC" CAPC0603X03N 682.473,55.999 r90 top value=1u
C240 "C0603X5R0J105M030BC" CAPC0603X03N 791.673,55.999 r90 top value=1u
C241 "C0603X5R1A104K030BC" CAPC0603X03N 573.373,55.999 r90 top value=0.1u
C243 "CC0402MRX5R4BB106" CAPC1005X06N 282.874,56.299 r90 top value=10u
C244 "CC0402MRX5R4BB106" CAPC1005X06N 391.873,56.299 r90 top value=10u
C245 "CC0402MRX5R4BB106" CAPC1005X06N 602.473,56.299 r90 top value=10u
C246 "C0603X5R1A104K030BC" CAPC0603X03N 799.073,55.999 r90 top value=0.1u
C247 "C0603X5R0J105M030BC" CAPC0603X03N 580.273,55.999 r90 top value=1u
C248 "C1608X5R0J226M080AC" CAPC1608X08N 690.173,56.799 r90 top value=22u
C249 "CC0402MRX5R4BB106" CAPC1005X06N 492.973,56.299 r90 top value=10u
C250 "C1005X5R0J475K050BC" CAPC1005X06N 290.274,56.299 r90 top value=4.7u
C251 "C1005X5R0J475K050BC" CAPC1005X06N 399.273,56.299 r90 top value=4.7u
C252 "CC0402MRX5R4BB106" CAPC1005X06N 609.873,56.299 r90 top value=10u
C253 "C0603X5R1A104K030BC" CAPC0603X03N 806.473,55.999 r90 top value=0.1u
C254 "C0603X5R1A104K030BC" CAPC0603X03N 587.673,55.999 r90 top value=0.1u
C255 "CC0402MRX5R4BB106" CAPC1005X06N 697.273,56.299 r90 top value=10u
C256 "CC0402MRX5R4BB106" CAPC1005X06N 500.373,56.299 r90 top value=10u
C257 "C0603X5R0J105M030BC" CAPC0603X03N 405.973,55.999 r90 top value=1u
C258 "C0603X5R0J105M030BC" CAPC0603X03N 297.474,55.999 r90 top value=1u
C259 "C0603X5R0J105M030BC" CAPC0603X03N 617.173,55.999 r90 top value=1u
C260 "C0603X5R1A104K030BC" CAPC0603X03N 813.873,55.999 r90 top value=0.1u
C261 "C0603X5R0J105M030BC" CAPC0603X03N 704.573,55.999 r90 top value=1u
C262 "C0603X5R0J105M030BC" CAPC0603X03N 326.974,55.999 r90 top value=1u
C263 "C0603X5R0J105M030BC" CAPC0603X03N 167.074,55.999 r90 top value=1u
C264 "C1005X5R0J475K050BC" CAPC1005X06N 507.773,56.299 r90 top value=4.7u
C265 "C0603X5R0J105M030BC" CAPC0603X03N 413.373,55.999 r90 top value=1u
C266 "C0603X5R0J105M030BC" CAPC0603X03N 304.874,55.999 r90 top value=1u
C267 "C0603X5R1A104K030BC" CAPC0603X03N 624.473,55.999 r90 top value=0.1u
C268 "C0603X5R1A104K030BC" CAPC0603X03N 711.373,55.999 r90 top value=0.1u
C269 "C0603X5R1A104K030BC" CAPC0603X03N 631.873,55.999 r90 top value=0.1u
C270 "C0603X5R1A104K030BC" CAPC0603X03N 514.973,55.999 r90 top value=0.1u
C271 "C0603X5R1A104K030BC" CAPC0603X03N 420.673,55.999 r90 top value=0.1u
C272 "C0603X5R1A104K030BC" CAPC0603X03N 312.174,55.999 r90 top value=0.1u
C273 "C1608X5R0J106K080AB" CAPC1608X08N 319.874,56.799 r90 top value=10u
C274 "C0603X5R1A104K030BC" CAPC0603X03N 1250.772,55.999 r90 top value=0.1u
C275 "C0603X5R1A104K030BC" CAPC0603X03N 212.074,55.999 r90 top value=0.1u
C276 "C0603X5R1A104K030BC" CAPC0603X03N 135.374,55.999 r90 top value=0.1u
C277 "C0603X5R1A104K030BC" CAPC0603X03N 449.673,55.999 r90 top value=0.1u
C278 "C0603X5R0J105M030BC" CAPC0603X03N 340.174,55.999 r90 top value=1u
C279 "C0603X5R0J105M030BC" CAPC0603X03N 219.474,55.999 r90 top value=1u
C280 "C0603X5R0J105M030BC" CAPC0603X03N 142.674,55.999 r90 top value=1u
C281 "C0603X5R1A104K030BC" CAPC0603X03N 457.073,55.999 r90 top value=0.1u
C282 "C0603X5R1A104K030BC" CAPC0603X03N 347.574,55.999 r90 top value=0.1u
C283 "C0603X5R0J105M030BC" CAPC0603X03N 594.973,55.999 r90 top value=1u
C284 "C0603X5R0J105M030BC" CAPC0603X03N 463.873,55.999 r90 top value=1u
C285 "C0603X5R1A104K030BC" CAPC0603X03N 354.874,55.999 r90 top value=0.1u
C286 "C0603X5R0J105M030BC" CAPC0603X03N 639.273,55.999 r90 top value=1u
C287 "C1005X5R0J475K050BC" CAPC1005X06N 471.373,56.299 r90 top value=4.7u
C288 "C0603X5R0J105M030BC" CAPC0603X03N 362.274,55.999 r90 top value=1u
C289 "C0603X5R1A104K030BC" CAPC0603X03N 226.874,55.999 r90 top value=0.1u
C290 "C1005X5R0J475K050BC" CAPC1005X06N 369.774,56.299 r90 top value=4.7u
C291 "CC0402MRX5R4BB106" CAPC1005X06N 478.773,56.299 r90 top value=10u
C292 "C0603X5R0J105M030BC" CAPC0603X03N 234.174,55.999 r90 top value=1u
C293 "CC0402MRX5R4BB106" CAPC1005X06N 485.673,56.299 r90 top value=10u
C294 "CC0402MRX5R4BB106" CAPC1005X06N 377.174,56.299 r90 top value=10u
C295 "C0603X5R1A104K030BC" CAPC0603X03N 718.773,55.999 r90 top value=0.1u
C296 "CC0402MRX5R4BB106" CAPC1005X06N 384.473,56.299 r90 top value=10u
C297 "C0603X5R0J105M030BC" CAPC0603X03N 726.173,55.999 r90 top value=1u
C303 "C0603X5R1A104K030BC" CAPC0603X03N 1232.172,55.999 r90 top value=0.1u
C304 "C0603X5R0J105M030BC" CAPC0603X03N 1128.172,55.999 r90 top value=1u
C305 "C0603X5R1A104K030BC" CAPC0603X03N 1042.572,55.999 r90 top value=0.1u
C306 "C0603X5R1A104K030BC" CAPC0603X03N 1049.872,55.999 r90 top value=0.1u
C307 "C0603X5R1A104K030BC" CAPC0603X03N 1258.072,55.999 r90 top value=0.1u
C308 "C0603X5R1A104K030BC" CAPC0603X03N 1205.772,55.999 r90 top value=0.1u
C309 "C0603X5R1A104K030BC" CAPC0603X03N 1213.072,55.999 r90 top value=0.1u
C310 "C0603X5R0J105M030BC" CAPC0603X03N 1093.072,55.999 r90 top value=1u
C311 "C0603X5R1A104K030BC" CAPC0603X03N 1100.272,55.999 r90 top value=0.1u
C312 "C1005X5R0J475K050BC" CAPC1005X06N 1106.972,56.299 r90 top value=4.7u
C313 "C0603X5R0J105M030BC" CAPC0603X03N 1113.972,55.999 r90 top value=1u
C314 "C0603X5R1A104K030BC" CAPC0603X03N 1121.072,55.999 r90 top value=0.1u
C316 "C0603X5R1A104K030BC" CAPC0603X03N 1057.272,55.999 r90 top value=0.1u
C317 "C0603X5R0J105M030BC" CAPC0603X03N 1064.372,55.999 r90 top value=1u
C318 "C1005X5R0J475K050BC" CAPC1005X06N 1071.672,56.299 r90 top value=4.7u
C319 "C0603X5R0J105M030BC" CAPC0603X03N 1078.672,55.999 r90 top value=1u
C320 "C1005X5R0J475K050BC" CAPC1005X06N 1085.872,56.299 r90 top value=4.7u
C321 "C0603X5R0J105M030BC" CAPC0603X03N 886.972,55.999 r90 top value=1u
C322 "C0603X5R0J105M030BC" CAPC0603X03N 893.872,55.999 r90 top value=1u
C323 "C1005X5R0J475K050BC" CAPC1005X06N 901.372,56.299 r90 top value=4.7u
C324 "C1005X5R0J475K050BC" CAPC1005X06N 974.072,56.299 r90 top value=4.7u
C325 "C0603X5R1A104K030BC" CAPC0603X03N 1176.272,55.999 r90 top value=0.1u
C326 "C1005X5R0J475K050BC" CAPC1005X06N 908.772,56.299 r90 top value=4.7u
C327 "C0603X5R0J105M030BC" CAPC0603X03N 981.272,55.999 r90 top value=1u
C328 "CC0402MRX5R4BB106" CAPC1005X06N 927.772,56.299 r90 top value=10u
C329 "C0603X5R1A104K030BC" CAPC0603X03N 1183.672,55.999 r90 top value=0.1u
C330 "C0603X5R0J105M030BC" CAPC0603X03N 915.972,55.999 r90 top value=1u
C331 "C0603X5R1A104K030BC" CAPC0603X03N 1035.672,55.999 r90 top value=0.1u
C332 "C0603X5R1A104K030BC" CAPC0603X03N 988.672,55.999 r90 top value=0.1u
C333 "C0603X5R1A104K030BC" CAPC0603X03N 996.072,55.999 r90 top value=0.1u
C334 "C0603X5R1A104K030BC" CAPC0603X03N 1003.372,55.999 r90 top value=0.1u
C335 "C0603X5R1A104K030BC" CAPC0603X03N 1010.772,55.999 r90 top value=0.1u
C336 "C0603X5R1A104K030BC" CAPC0603X03N 241.574,55.999 r90 top value=0.1u
C337 "C0603X5R1A104K030BC" CAPC0603X03N 248.974,55.999 r90 top value=0.1u
C338 "C0603X5R1A104K030BC" CAPC0603X03N 256.274,55.999 r90 top value=0.1u
C339 "C0603X5R1A104K030BC" CAPC0603X03N 263.674,55.999 r90 top value=0.1u
C340 "C0603X5R1A104K030BC" CAPC0603X03N 865.373,55.999 r90 top value=0.1u
C341 "C0603X5R1A104K030BC" CAPC0603X03N 872.773,55.999 r90 top value=0.1u
C342 "C0603X5R1A104K030BC" CAPC0603X03N 879.672,55.999 r90 top value=0.1u
C343 "C0603X5R1A104K030BC" CAPC0603X03N 821.173,55.999 r90 top value=0.1u
C344 "C0603X5R1A104K030BC" CAPC0603X03N 828.573,55.999 r90 top value=0.1u
C345 "C0603X5R1A104K030BC" CAPC0603X03N 835.973,55.999 r90 top value=0.1u
C346 "C0603X5R1A104K030BC" CAPC0603X03N 843.273,55.999 r90 top value=0.1u
C347 "C0603X5R1A104K030BC" CAPC0603X03N 850.673,55.999 r90 top value=0.1u
C348 "C0603X5R1A104K030BC" CAPC0603X03N 1190.972,55.999 r90 top value=0.1u
C349 "C0603X5R1A104K030BC" CAPC0603X03N 1162.072,55.999 r90 top value=0.1u
C350 "C0603X5R1A104K030BC" CAPC0603X03N 858.073,55.999 r90 top value=0.1u
C351 "C0603X5R1A104K030BC" CAPC0603X03N 1169.372,55.999 r90 top value=0.1u
C352 "C0603X5R1A104K030BC" CAPC0603X03N 1198.372,55.999 r90 top value=0.1u
C353 "C1608X5R0J106K080AB" CAPC1608X08N 113.274,10.9 r90 top value=10u
C354 "C1005X5R0J475K050BC" CAPC1005X06N 120.474,10.4 r90 top value=4.7u
C355 "C1608X5R0J106K080AB" CAPC1608X08N 92.974,10.9 r90 top value=10u
C356 "C1608X5R0J106K080AB" CAPC1608X08N 72.674,10.9 r90 top value=10u
C357 "GRM155R71H103KA88D" CAPC1005X06N 65.074,10.4 r90 top value=10n
C358 "C1005X5R0J475K050BC" CAPC1005X06N 100.074,10.4 r90 top value=4.7u
C359 "C1005X5R0J475K050BC" CAPC1005X06N 79.774,10.4 r90 top value=4.7u
C? "GRM155R71H103KA88D" CAPC1005X06N 170.974,-2.1 r0 top value=10n
D1 "RK806-1" QFN35P700X700X90_HS-69N 53.1,15 r180 top
D2 "RK860-2" WLCSP20_RCC-L 340.974,10.7 r0 top
D3 "RK860-2" WLCSP20_RCC-L 226.874,10.7 r0 top
D4 "RK860-3" WLCSP20_RCC-L 350.874,10.7 r0 top
D5 "SY8089AAC" SOT95P280X145-5N 237.874,11.1 r0 top
D6 "MT53E2G32D4DE-046 AAT:A" BGA200C65P12X22_1000X1450X114 8.538,10.927 r225 top
D7 "MT53E2G32D4DE-046 AAT:A" BGA200C65P12X22_1000X1450X114 7.137,35.173 r135 top
D8 "KLM8G1GETF-B041" BGA196C50P14X14_1170X1300X170 46.078,36.552 r90 top
D9 "RK3588M" BGA1088C65P34X34_2300X2300X204N 25.25,23.75 r45 top
D10 "1P1G3157QDBVRQ1" SOT95P280X145-6N 163.174,56.999 r0 top
D11 "MCP1824T-3302E/OT" SOT95P280X145-5N 129.374,11.1 r0 top
D12 "BL8555-33PRA" SOT95P280X145-5N 109.074,11.1 r0 top
D13 "RT9167A-18CB" SOT95P280X145-5N 88.774,11.1 r0 top
J1 "DF12NA(3.0)-80DS-0.5V(51)" CONN_DF12NA3.0-80DS-0.5V51_HIR 45.5,-11 r180 bottom
J2 "DF40C-100DP-0.4V(51)" CONN100_DF40C-100DP-0.4V51_HIR 45.4,54.1 r180 bottom
J3 "DF12NA(3.0)-80DS-0.5V(51)" CONN_DF12NA3.0-80DS-0.5V51_HIR 6.65,55.9 r180 bottom
J4 "DF12NA(3.0)-80DS-0.5V(51)" CONN_DF12NA3.0-80DS-0.5V51_HIR 15.35,-10.7 r180 bottom
L1 "TMS322512ALM-R22MTAA" INDC3225X12N 607.173,-1.1 r0 top value=220n
L2 "WIP201610P-R47ML" INDC2016X10N 330.574,-1.6 r0 top value=0u47
L3 "WIP201610P-R47ML" INDC2016X10N 133.174,-1.6 r0 top value=0u47
L4 "WIP201610P-R47ML" INDC2016X10N 83.525,3.7 r0 top value=0u47
L5 "WIP201610P-R47ML" INDC2016X10N 271.374,-1.6 r0 top value=0u47
L6 "TMS322512ALM-R22MTAA" INDC3225X12N 424.4,-25.3 r0 top value=220n
L7 "TMS322512ALM-R22MTAA" INDC3225X12N 428.473,-1.1 r0 top value=220n
L8 "TMS322512ALM-R22MTAA" INDC3225X12N 379.473,-1.1 r0 top value=220n
L9 "WIP201610P-R47ML" INDC2016X10N 201.774,-1.6 r0 top value=0u47
L10 "WIP201610P-R47ML" INDC2016X10N 165.674,-1.6 r0 top value=0u47
L11 "TMS322512ALM-R22MTAA" INDC3225X12N 336.274,11 r0 top value=220n
L12 "TMS322512ALM-R22MTAA" INDC3225X12N 221.974,11 r0 top value=220n
L14 "TMS322512ALM-R22MTAA" INDC3225X12N 345.874,11 r0 top value=220n
L15 "SWPA4026S2R2MT" INDP4040X26N 232.174,11.8 r0 top value=2u2
R1 "RC0402JR-07100RL" RESC1005X04N 970.672,55.799 r0 top value=100R
R2 "RC0402JR-07100RL" RESC1005X04N 923.972,55.799 r0 top value=100R
R9 "RC0402JR-07100RL" RESC1005X04N 197.174,-2.2 r0 top value=100R
R10 "RC0402JR-07100RL" RESC1005X04N 274.874,-1.7 r90 top value=100R
R11 "RC0402JR-07100RL" RESC1005X04N 136.674,-1.7 r90 top value=100R
R12 "NC0402" RESC1005X04N 159.274,-1.7 r90 top value=NC
R13 "RC0402JR-07100RL" RESC1005X04N 226.374,-1.7 r90 top value=100R
R14 "RC0402JR-07100RL" RESC1005X04N 205.274,-1.7 r90 top value=100R
R15 "RC0402JR-07100RL" RESC1005X04N 600.073,-1.7 r90 top value=100R
R16 "RC0402JR-07100RL" RESC1005X04N 319.874,-1.7 r90 top value=100R
R17 "RC0402FR-07120KL" RESC1005X04N 260.674,-1.7 r90 top value=120K
R18 "RC0402JR-07100RL" RESC1005X04N 216.474,-1.7 r90 top value=100R
R19 "RC0402JR-070RL" RESC1005X04N 121.474,-1.7 r90 top value=0R
R20 "RC0402FR-0720KL" RESC1005X04N 92.774,-1.7 r90 top value=20K
R22 "RC0402JR-07100RL" RESC1005X04N 473.8,-5.7 r90 top value=100R
R23 "RC0402JR-07100RL" RESC1005X04N 416.873,-1.7 r90 top value=100R
R24 "RC0402JR-07100RL" RESC1005X04N 372.174,-1.7 r90 top value=100R
R35 "RC0402JR-07100KL" RESC1005X04N 247.674,10.4 r90 top value=100K
R36 "RC0402JR-07120KL" RESC1005X04N 241.774,10.4 r90 top value=120K
R37 "RC0402JR-07100KL" RESC1005X04N 311.374,10.4 r90 top value=100K
R38 "RC0402JR-07100KL" RESC1005X04N 191.274,10.4 r90 top value=100K
R41 "RC0402JR-0710KL" RESC1005X04N 144.974,10.4 r90 top value=10K
R42 "RC0402JR-07100KL" RESC1005X04N 328.974,10.4 r90 top value=100K
R45 "RC0402FR-07100KL" RESC1005X04N 214.574,10.4 r90 top value=100K
R46 "RC0402FR-07120KL" RESC1005X04N 139.174,10.4 r90 top value=120K
R49 "RC0201FR-07240RL" RESC0603X02N 651.573,17 r90 top value=240R
R50 "RC0402JR-0710KL" RESC1005X04N 674.673,17.3 r90 top value=10K
R51 "RC0402JR-0710KL" RESC1005X04N 663.473,17.3 r90 top value=10K